# Altium PCB PCB-MAIN.PcbDoc (part 2 of 6)
Units mm, origin at the board's own origin, x right, y up, seen from the top; angles counter-clockwise.
Board outline 110 x 75 mm, 8 copper layers (F.Cu, In1.Cu, In2.Cu, In3.Cu, In4.Cu, In5.Cu, In6.Cu, B.Cu); 251 components, 185 nets, 1143 pads, 853 vias.
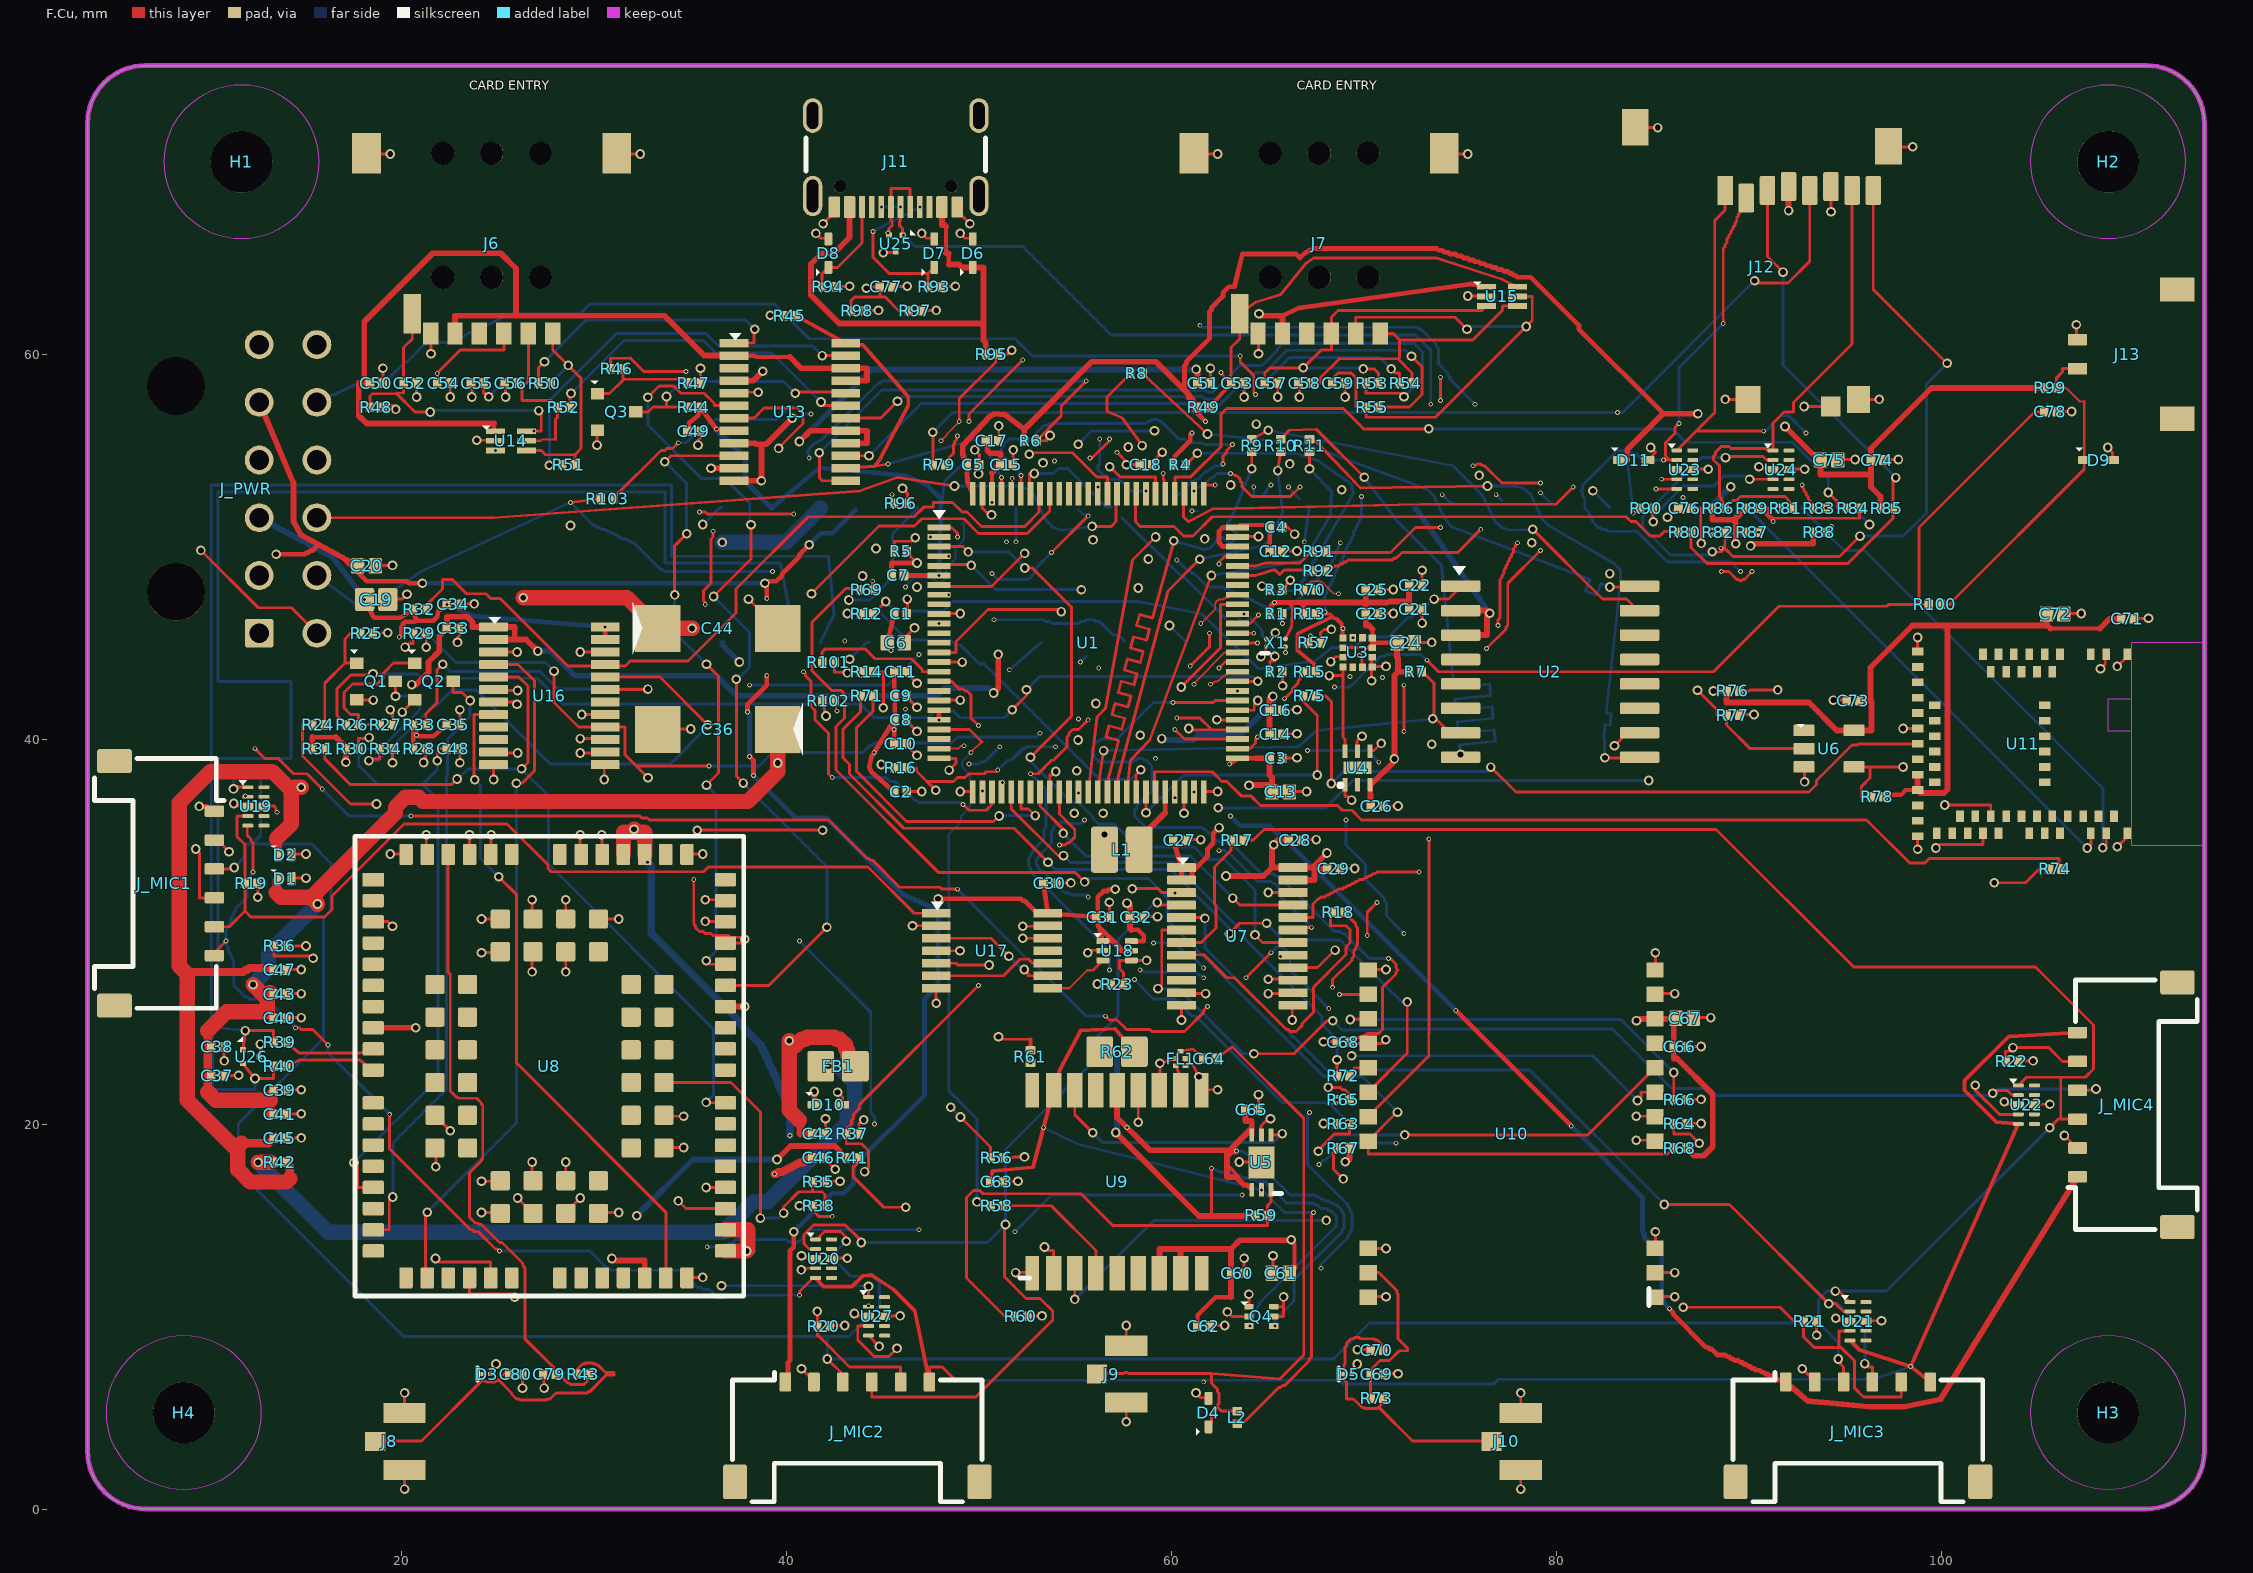
[diagram p0: F.Cu view]

## Part data (continued)
U18: library part TI_DRL0006A_SOT6, "TI DRL0006A 6-pin SOT-5X3; 4223266/F 11/2024 example board layout", DIONEA_PACKAGE=SOT-5X3-6_DRL, DIONEA_FOOTPRINT_SOURCE=TI_DRL0006A_4223266F_2024-11_RecommendedLandPattern, DIONEA_FOOTPRINT_STATUS=MANUFACTURER_DRAWING_PATTERN_CONTROLLED, DIONEA_PLACEMENT_CLASS=UNLOCKED_LAYOUT_CANDIDATE, DIONEA_PLACEMENT_SOURCE=PCB_MAIN_PLACEMENT_REPACK_REV_A, DIONEA_POPULATION=FITTED
U19 U20 U21 U22 U23 U24 U27: library part TI_DQA0010A_USON10, "TI DQA0010A 10-pin USON; 4220328/A 12/2015 example board layout", DIONEA_PACKAGE=USON-10_DQA, DIONEA_FOOTPRINT_SOURCE=TI_DQA0010A_4220328A_2015-12_RecommendedLandPattern, DIONEA_FOOTPRINT_STATUS=MANUFACTURER_DRAWING_PATTERN_CONTROLLED, DIONEA_PLACEMENT_CLASS=UNLOCKED_LAYOUT_CANDIDATE, DIONEA_PLACEMENT_SOURCE=PCB_MAIN_PLACEMENT_REPACK_REV_A, DIONEA_POPULATION=FITTED
U25 U26: library part TI_DRT0003A_IPC_Candidate, "TI DRT0003A 3-pin SOT-9X3; project-controlled KiCad package-derived candidate; assembler DFM and USB SI review required", DIONEA_PACKAGE=SOT-9X3_DRT, DIONEA_FOOTPRINT_SOURCE=PROJECT_IPC_TI_DRT0003A_KICAD_DRT3_ASSEMBLER_DFM_REQUIRED, DIONEA_FOOTPRINT_STATUS=PROJECT_IPC_PATTERN_CONTROLLED_ASSEMBLY_DFM_REQUIRED, DIONEA_PLACEMENT_CLASS=UNLOCKED_LAYOUT_CANDIDATE, DIONEA_PLACEMENT_SOURCE=PCB_MAIN_PLACEMENT_REPACK_REV_A, DIONEA_POPULATION=FITTED
X1: library part SiT1552_JE_CSP-4, "SiTime SiT1552 JE 4LD 1.54x0.84 mm CSP; POD-35 Rev A recommended land pattern", DIONEA_PACKAGE=CSP-4_1.5x0.8mm, DIONEA_FOOTPRINT_SOURCE=SiTime_SiT1552_Rev1.43_POD-35_RevA, DIONEA_FOOTPRINT_STATUS=MANUFACTURER_DRAWING_PATTERN_CONTROLLED, DIONEA_PLACEMENT_CLASS=UNLOCKED_LAYOUT_CANDIDATE, DIONEA_PLACEMENT_SOURCE=PCB_MAIN_PLACEMENT_REPACK_REV_A, DIONEA_POPULATION=FITTED

## Via types
v1: diameter 0.5, hole 0.3, F.Cu to B.Cu, tented both sides, 579 vias
v2: diameter 0.25, hole 0.15, F.Cu to B.Cu, tented both sides, 274 vias